# Altium PCB SnakeCard_Native.PcbDoc (part 1 of 2)
Units mm, origin at the board's own origin, x right, y up, seen from the top; angles counter-clockwise.
Board outline 85.6 x 54 mm, 2 copper layers (F.Cu, B.Cu), stack 0.8 mm thick; 136 components, 39 nets, 370 pads, 189 vias.
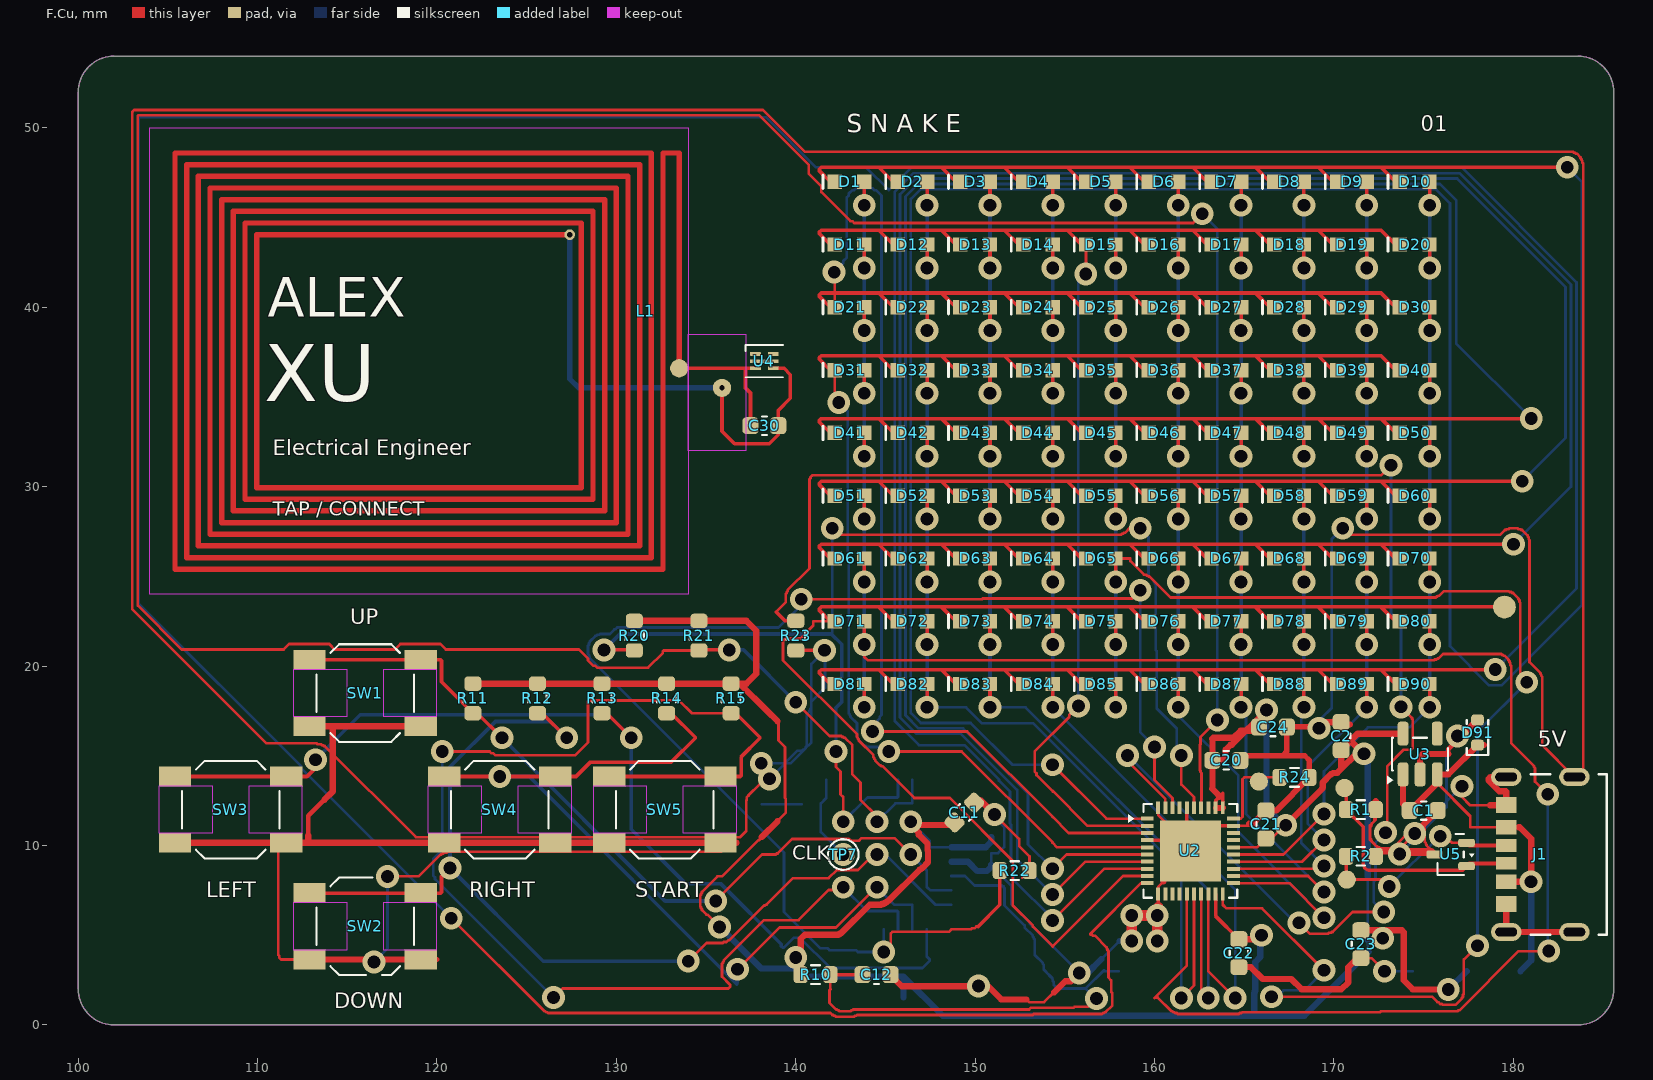
[diagram p0: F.Cu view]
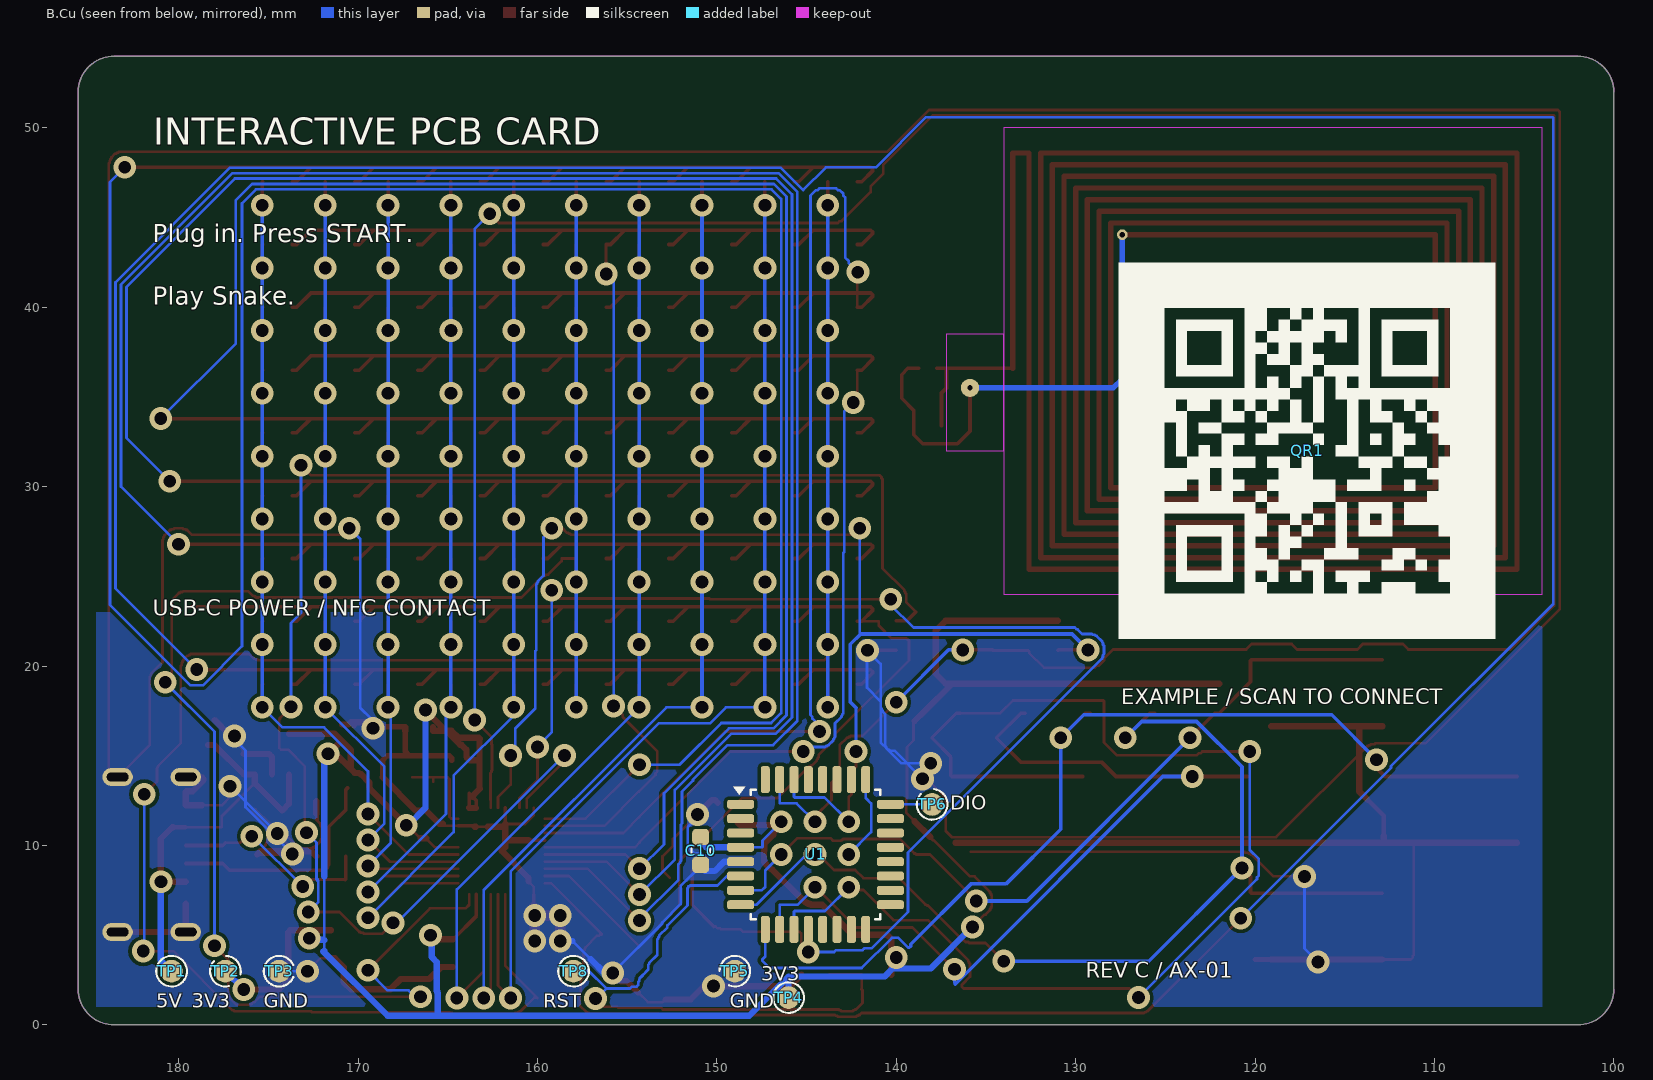
[diagram p1: B.Cu view, seen from below]

## Layer stack, top to bottom
F.Mask: solder mask 0.0102, Solder Resist, Dk 3.5
F.Cu: signal copper 0.0356
Dielectric 1: dielectric 0.7289, FR-4, Dk 4.8
B.Cu: signal copper 0.0356
B.Mask: solder mask 0.0102, Solder Resist, Dk 3.5

## Board outline
183.6,0 102,0 cw(c102,2) 100,2 100,52 cw(c102,52) 102,54 183.6,54 cw(c183.6,52) 185.6,52 185.6,2 cw(c183.6,2)

## Design rules (kind name [scope] priority, off if disabled: settings)
BoardOutlineClearance [All] p1: gap=0.3 ignorepadtopadclearanceinfootprint=FALSE
Clearance Native_SW5_OwnPad_Keepout_0 [IsFill And IsKeepOut And InComponent('SW5') vs IsPad And InComponent('SW5')] p1: gap=0 ignorepadtopadclearanceinfootprint=FALSE // Own SW pad only; source tangent boundary; 5.08nm fill inset; foreign clearance retained; UI priority and DRC pending.
Clearance Native_SW4_OwnPad_Keepout_0 [IsFill And IsKeepOut And InComponent('SW4') vs IsPad And InComponent('SW4')] p2: gap=0 ignorepadtopadclearanceinfootprint=FALSE // Own SW pad only; source tangent boundary; 5.08nm fill inset; foreign clearance retained; UI priority and DRC pending.
Clearance Native_SW3_OwnPad_Keepout_0 [IsFill And IsKeepOut And InComponent('SW3') vs IsPad And InComponent('SW3')] p3: gap=0 ignorepadtopadclearanceinfootprint=FALSE // Own SW pad only; source tangent boundary; 5.08nm fill inset; foreign clearance retained; UI priority and DRC pending.
Clearance Native_SW2_OwnPad_Keepout_0 [IsFill And IsKeepOut And InComponent('SW2') vs IsPad And InComponent('SW2')] p4: gap=0 ignorepadtopadclearanceinfootprint=FALSE // Own SW pad only; source tangent boundary; 5.08nm fill inset; foreign clearance retained; UI priority and DRC pending.
Clearance Native_SW1_OwnPad_Keepout_0 [IsFill And IsKeepOut And InComponent('SW1') vs IsPad And InComponent('SW1')] p5: gap=0 ignorepadtopadclearanceinfootprint=FALSE // Own SW pad only; source tangent boundary; 5.08nm fill inset; foreign clearance retained; UI priority and DRC pending.
Clearance "Clearence 0.2_Polygon" [InNamedPolygon('B.Cu-GND')] p6: gap=0.2 ignorepadtopadclearanceinfootprint=FALSE
Clearance Native_Global_Clearance_0p15mm [All] p7: gap=0.15 ignorepadtopadclearanceinfootprint=FALSE // Source global copper clearance 0.15mm; enable only below polygon 0.2mm priority.
HoleSize [All] p1: absolutevalues=TRUE maxlimit=2.54 minlimit=0.3 maxpercent=80.000 minpercent=20.000
MinimumAnnularRing Native_AnnularRing_0p10mm [All] p1: minimumring=0.1
MinimumSolderMaskSliver [All] p1: minsoldermaskwidth=0.13
PolygonConnect Polygon_B.Cu-GND_ConnectDirect [IsNamedPolygon('B.Cu-GND')] p1: connectstyle=Direct reliefconductorwidth=0.254 reliefentries=4 polygonreliefangle="90 Angle" airgapwidth=0.254
RoutingVias [All] p1: holewidth=0.711 width=1.27 viastyle="Through Hole" minholewidth=0.711 minwidth=1.27 maxholewidth=0.711 maxwidth=1.27
SilkToSilkClearance [All] p1: silktosilkclearance=0
SilkToSolderMaskClearance [All] p1: minsilkscreentomaskgap=0.15 clearancetoexposedcopper=FALSE
SolderMaskExpansion [All] p1: expansion=0 istentingtop=FALSE
Width [All] p1: maxlimit=10 minlimit=0.15 preferedwidth=0.2 minimp=50.000000 maximp=50.000000 favimp=50.000000
26 further rules are at their usual default settings.

## Components (designator, comment, footprint, x,y, rotation, side; value= is the part's Value field where it differs from the comment)
C1 "1uF 25V X7R" C_0603_1608Metric 175,11.95 r0 top
C2 "1uF 25V X7R" C_0603_1608Metric 170.4,16.1 r90 top
C10 "100nF 50V X7R" C_0603_1608Metric 150.9,9.7 r270 bottom
C11 "4.7uF 16V" C_0603_1608Metric 149.398,11.841 r45 top
C12 "100nF 50V X7R" C_0603_1608Metric 144.5,2.8 r0 top
C20 "100nF 50V X7R" C_0603_1608Metric 164,14.75 r0 top
C21 "100nF 50V X7R" C_0603_1608Metric 166.2,11.175 r90 top
C22 "100nF 50V X7R" C_0603_1608Metric 164.7,4 r270 top
C23 "1uF 25V X7R" C_0603_1608Metric 171.5,4.5 r270 top
C24 "1uF 25V X7R" C_0603_1608Metric 166.6,16.6 r0 top
C30 "DNP / C0G TUNE" C_0603_1608Metric__DNP_NOPASTE 138.25,33.4 r0 top
D1 "KT-0603R" Kingbright_APT1608SURCK 143,47 r0 top
D2 "KT-0603R" Kingbright_APT1608SURCK 146.5,47 r0 top
D3 "KT-0603R" Kingbright_APT1608SURCK 150,47 r0 top
D4 "KT-0603R" Kingbright_APT1608SURCK 153.5,47 r0 top
D5 "KT-0603R" Kingbright_APT1608SURCK 157,47 r0 top
D6 "KT-0603R" Kingbright_APT1608SURCK 160.5,47 r0 top
D7 "KT-0603R" Kingbright_APT1608SURCK 164,47 r0 top
D8 "KT-0603R" Kingbright_APT1608SURCK 167.5,47 r0 top
D9 "KT-0603R" Kingbright_APT1608SURCK 171,47 r0 top
D10 "KT-0603R" Kingbright_APT1608SURCK 174.5,47 r0 top
D11 "KT-0603R" Kingbright_APT1608SURCK 143,43.5 r0 top
D12 "KT-0603R" Kingbright_APT1608SURCK 146.5,43.5 r0 top
D13 "KT-0603R" Kingbright_APT1608SURCK 150,43.5 r0 top
D14 "KT-0603R" Kingbright_APT1608SURCK 153.5,43.5 r0 top
D15 "KT-0603R" Kingbright_APT1608SURCK 157,43.5 r0 top
D16 "KT-0603R" Kingbright_APT1608SURCK 160.5,43.5 r0 top
D17 "KT-0603R" Kingbright_APT1608SURCK 164,43.5 r0 top
D18 "KT-0603R" Kingbright_APT1608SURCK 167.5,43.5 r0 top
D19 "KT-0603R" Kingbright_APT1608SURCK 171,43.5 r0 top
D20 "KT-0603R" Kingbright_APT1608SURCK 174.5,43.5 r0 top
D21 "KT-0603R" Kingbright_APT1608SURCK 143,40 r0 top
D22 "KT-0603R" Kingbright_APT1608SURCK 146.5,40 r0 top
D23 "KT-0603R" Kingbright_APT1608SURCK 150,40 r0 top
D24 "KT-0603R" Kingbright_APT1608SURCK 153.5,40 r0 top
D25 "KT-0603R" Kingbright_APT1608SURCK 157,40 r0 top
D26 "KT-0603R" Kingbright_APT1608SURCK 160.5,40 r0 top
D27 "KT-0603R" Kingbright_APT1608SURCK 164,40 r0 top
D28 "KT-0603R" Kingbright_APT1608SURCK 167.5,40 r0 top
D29 "KT-0603R" Kingbright_APT1608SURCK 171,40 r0 top
D30 "KT-0603R" Kingbright_APT1608SURCK 174.5,40 r0 top
D31 "KT-0603R" Kingbright_APT1608SURCK 143,36.5 r0 top
D32 "KT-0603R" Kingbright_APT1608SURCK 146.5,36.5 r0 top
D33 "KT-0603R" Kingbright_APT1608SURCK 150,36.5 r0 top
D34 "KT-0603R" Kingbright_APT1608SURCK 153.5,36.5 r0 top
D35 "KT-0603R" Kingbright_APT1608SURCK 157,36.5 r0 top
D36 "KT-0603R" Kingbright_APT1608SURCK 160.5,36.5 r0 top
D37 "KT-0603R" Kingbright_APT1608SURCK 164,36.5 r0 top
D38 "KT-0603R" Kingbright_APT1608SURCK 167.5,36.5 r0 top
D39 "KT-0603R" Kingbright_APT1608SURCK 171,36.5 r0 top
D40 "KT-0603R" Kingbright_APT1608SURCK 174.5,36.5 r0 top
D41 "KT-0603R" Kingbright_APT1608SURCK 143,33 r0 top
D42 "KT-0603R" Kingbright_APT1608SURCK 146.5,33 r0 top
D43 "KT-0603R" Kingbright_APT1608SURCK 150,33 r0 top
D44 "KT-0603R" Kingbright_APT1608SURCK 153.5,33 r0 top
D45 "KT-0603R" Kingbright_APT1608SURCK 157,33 r0 top
D46 "KT-0603R" Kingbright_APT1608SURCK 160.5,33 r0 top
D47 "KT-0603R" Kingbright_APT1608SURCK 164,33 r0 top
D48 "KT-0603R" Kingbright_APT1608SURCK 167.5,33 r0 top
D49 "KT-0603R" Kingbright_APT1608SURCK 171,33 r0 top
D50 "KT-0603R" Kingbright_APT1608SURCK 174.5,33 r0 top
D51 "KT-0603R" Kingbright_APT1608SURCK 143,29.5 r0 top
D52 "KT-0603R" Kingbright_APT1608SURCK 146.5,29.5 r0 top
D53 "KT-0603R" Kingbright_APT1608SURCK 150,29.5 r0 top
D54 "KT-0603R" Kingbright_APT1608SURCK 153.5,29.5 r0 top
D55 "KT-0603R" Kingbright_APT1608SURCK 157,29.5 r0 top
D56 "KT-0603R" Kingbright_APT1608SURCK 160.5,29.5 r0 top
D57 "KT-0603R" Kingbright_APT1608SURCK 164,29.5 r0 top
D58 "KT-0603R" Kingbright_APT1608SURCK 167.5,29.5 r0 top
D59 "KT-0603R" Kingbright_APT1608SURCK 171,29.5 r0 top
D60 "KT-0603R" Kingbright_APT1608SURCK 174.5,29.5 r0 top
D61 "KT-0603R" Kingbright_APT1608SURCK 143,26 r0 top
D62 "KT-0603R" Kingbright_APT1608SURCK 146.5,26 r0 top
D63 "KT-0603R" Kingbright_APT1608SURCK 150,26 r0 top
D64 "KT-0603R" Kingbright_APT1608SURCK 153.5,26 r0 top
D65 "KT-0603R" Kingbright_APT1608SURCK 157,26 r0 top
D66 "KT-0603R" Kingbright_APT1608SURCK 160.5,26 r0 top
D67 "KT-0603R" Kingbright_APT1608SURCK 164,26 r0 top
D68 "KT-0603R" Kingbright_APT1608SURCK 167.5,26 r0 top
D69 "KT-0603R" Kingbright_APT1608SURCK 171,26 r0 top
D70 "KT-0603R" Kingbright_APT1608SURCK 174.5,26 r0 top
D71 "KT-0603R" Kingbright_APT1608SURCK 143,22.5 r0 top
D72 "KT-0603R" Kingbright_APT1608SURCK 146.5,22.5 r0 top
D73 "KT-0603R" Kingbright_APT1608SURCK 150,22.5 r0 top
D74 "KT-0603R" Kingbright_APT1608SURCK 153.5,22.5 r0 top
D75 "KT-0603R" Kingbright_APT1608SURCK 157,22.5 r0 top
D76 "KT-0603R" Kingbright_APT1608SURCK 160.5,22.5 r0 top
D77 "KT-0603R" Kingbright_APT1608SURCK 164,22.5 r0 top
D78 "KT-0603R" Kingbright_APT1608SURCK 167.5,22.5 r0 top
D79 "KT-0603R" Kingbright_APT1608SURCK 171,22.5 r0 top
D80 "KT-0603R" Kingbright_APT1608SURCK 174.5,22.5 r0 top
D81 "KT-0603R" Kingbright_APT1608SURCK 143,19 r0 top
D82 "KT-0603R" Kingbright_APT1608SURCK 146.5,19 r0 top
D83 "KT-0603R" Kingbright_APT1608SURCK 150,19 r0 top
D84 "KT-0603R" Kingbright_APT1608SURCK 153.5,19 r0 top
D85 "KT-0603R" Kingbright_APT1608SURCK 157,19 r0 top
D86 "KT-0603R" Kingbright_APT1608SURCK 160.5,19 r0 top
D87 "KT-0603R" Kingbright_APT1608SURCK 164,19 r0 top
D88 "KT-0603R" Kingbright_APT1608SURCK 167.5,19 r0 top
D89 "KT-0603R" Kingbright_APT1608SURCK 171,19 r0 top
D90 "KT-0603R" Kingbright_APT1608SURCK 174.5,19 r0 top
D91 "PESD5Z6.0,115" D_SOD-523 178,16.3 r90 top
J1 "UJC-HP-3-SMT-TR" CUI_UJC-HP-3-SMT-TR 179.6,9.5 r90 top
L1 "PCB LOOP / TUNE" NFC_PRINTED_COIL_8T_UNTUNED 100,54 r0 top locked net-tie
QR1 "Example QR / https://example.com/" Example_QR_21mm_BSilk 117.1,32 r180 bottom
R1 "5.1k 1%" R_0603_1608Metric 171.5,12 r0 top
R2 "5.1k 1%" R_0603_1608Metric 171.5,9.4 r0 top
R10 "10k 1%" R_0603_1608Metric 141.1,2.8 r0 top
R11 "10k 1%" R_0603_1608Metric 122,18.2 r270 top
R12 "10k 1%" R_0603_1608Metric 125.6,18.2 r270 top
R13 "10k 1%" R_0603_1608Metric 129.2,18.2 r270 top
R14 "10k 1%" R_0603_1608Metric 132.8,18.2 r270 top
R15 "10k 1%" R_0603_1608Metric 136.4,18.2 r270 top
R20 "2.2k 1%" R_0603_1608Metric 131,21.7 r270 top
R21 "2.2k 1%" R_0603_1608Metric 134.6,21.7 r270 top
R22 "100k 1%" R_0603_1608Metric 152.2,8.6 r0 top
R23 "10k 1%" R_0603_1608Metric 140,21.7 r270 top
R24 "20k 1%" R_0603_1608Metric 167.8,13.8 r0 top
SW1 "UP" SW_SPST_SKQG_WithStem__HAND_SOLDER_NOPASTE 116,18.5 r0 top
SW2 "DOWN" SW_SPST_SKQG_WithStem__HAND_SOLDER_NOPASTE 116,5.5 r0 top
SW3 "LEFT" SW_SPST_SKQG_WithStem__HAND_SOLDER_NOPASTE 108.5,12 r0 top
SW4 "RIGHT" SW_SPST_SKQG_WithStem__HAND_SOLDER_NOPASTE 123.5,12 r0 top
SW5 "START" SW_SPST_SKQG_WithStem__HAND_SOLDER_NOPASTE 132.7,12 r0 top
TP1 "VBUS_5V" TestPoint_Pad_D1.0mm 180.391,2.997 r0 bottom locked
TP2 "+3V3" TestPoint_Pad_D1.0mm 177.394,2.997 r0 bottom
TP3 "GND" TestPoint_Pad_D1.0mm 174.396,2.997 r0 bottom
TP4 "+3V3" TestPoint_Pad_D1.0mm 145.999,1.524 r0 bottom locked
TP5 "GND" TestPoint_Pad_D1.0mm 148.996,2.997 r0 bottom locked
TP6 "SWDIO" TestPoint_Pad_D1.0mm 137.998,12.294 r0 bottom locked
TP7 "SWCLK" TestPoint_Pad_D1.0mm 142.646,9.5 r0 top locked
TP8 "NRST" TestPoint_Pad_D1.0mm 157.988,2.997 r0 bottom locked
U1 "STM32G030K8T6" LQFP-32_7x7mm_P0.8mm 144.5,9.5 r180 bottom
U2 "IS31FL3737B-QFLS4-TR" IS31FL3737_QFN40_5x5mm_P0.4mm_EP3.4mm 162,9.7 r0 top
U3 "TPS7A2433DBVR" SOT-23-5 174.8,15.1 r90 top
U4 "ST25TN01K-AFH5" ST25TN01K_UFDFPN5_1.7x1.4mm 138.25,37 r0 top
U5 "TPD2E2U06QDCKRQ1" SOT-323_SC-70 176.5,9.5 r180 top

## Footprints (in the part's own frame and the unit in brackets; to place one, negate y for a bottom-side part, rotate by r counter-clockwise, add the part's x,y. Pads: shape width x height; smd on the part's side, far side on the other; paste and mask are expansions set on the pad)
C_0603_1608Metric [mm]
  rrect50% 0.9x0.95 smd mask+0: 1(-0.775,0) 2(0.775,0)
  silkscreen extent -0.14,-0.51 0.14,0.51
C_0603_1608Metric__DNP_NOPASTE [mm]
  rrect50% 0.9x0.95 smd paste-0.485 mask+0: 1(-0.775,0) 2(0.775,0)
  silkscreen extent -0.14,-0.51 0.14,0.51
CUI_UJC-HP-3-SMT-TR [mm]
  rect 0.7x1.15 smd mask+0.05: A5(-0.5,0.005) B5(0.5,0.005)
  rect 0.8x1.15 smd mask+0.05: A9(1.52,0.005) B9(-1.52,0.005)
  rect 0.9x1.15 smd mask+0.05: A12(2.75,0.005) B12(-2.75,0.005)
  rrect100% 1x1.7 hole 1.2 slot 0.5 at 0 deg paste-2539.97 mask+0.05: S1(-4.32,0) S2(4.32,0) S3(-4.32,-3.8) S4(4.32,-3.8)
  silkscreen extent -4.47,-5.6 4.47,-1.35
D_SOD-523 [mm]
  rrect50% 0.6x0.7 smd mask+0: 1(-0.7,0) 2(0.7,0)
  silkscreen extent -1.26,-0.6 0.7,0.6
Example_QR_21mm_BSilk [mm]
  silkscreen extent -10.5,-10.5 10.5,10.5
IS31FL3737_QFN40_5x5mm_P0.4mm_EP3.4mm [mm]
  rect 0.715x0.22 smd mask+0: 1(-2.408,1.8) 2(-2.408,1.4) 3(-2.408,1) 4(-2.408,0.6) 5(-2.408,0.2) 6(-2.408,-0.2) 7(-2.408,-0.6) 8(-2.408,-1) 9(-2.408,-1.4) 10(-2.408,-1.8) 21(2.408,-1.8) 22(2.408,-1.4) 23(2.408,-1) 24(2.408,-0.6) 25(2.408,-0.2) 26(2.408,0.2) 27(2.408,0.6) 28(2.408,1) 29(2.408,1.4) 30(2.408,1.8)
  rect 0.22x0.715 smd mask+0: 11(-1.8,-2.408) 12(-1.4,-2.408) 13(-1,-2.408) 14(-0.6,-2.408) 15(-0.2,-2.408) 16(0.2,-2.408) 17(0.6,-2.408) 18(1,-2.408) 19(1.4,-2.408) 20(1.8,-2.408) 31(1.8,2.408) 32(1.4,2.408) 33(1,2.408) 34(0.6,2.408) 35(0.2,2.408) 36(-0.2,2.408) 37(-0.6,2.408) 38(-1,2.408) 39(-1.4,2.408) 40(-1.8,2.408)
  rect 3.4x3.4 smd paste-1.71 mask+0: 41(0,0)
  rrect25% 0.9x0.9 on Top Paste mask-0.9: ""(-1.1,-1.1) ""(-1.1,0) ""(-1.1,1.1) ""(0,-1.1) ""(0,0) ""(0,1.1) ""(1.1,-1.1) ""(1.1,0) ""(1.1,1.1)
  silkscreen extent -3.47,-2.61 2.61,2.61
Kingbright_APT1608SURCK [mm]
  rect 0.8x0.8 smd mask+0: 1(-0.825,0) 2(0.825,0)
  silkscreen extent -1.49,-0.38 -1.49,0.38
LQFP-32_7x7mm_P0.8mm [mm]
  rrect50% 1.5x0.5 smd mask+0: 1(-4.175,2.8) 2(-4.175,2) 3(-4.175,1.2) 4(-4.175,0.4) 5(-4.175,-0.4) 6(-4.175,-1.2) 7(-4.175,-2) 8(-4.175,-2.8) 17(4.175,-2.8) 18(4.175,-2) 19(4.175,-1.2) 20(4.175,-0.4) 21(4.175,0.4) 22(4.175,1.2) 23(4.175,2) 24(4.175,2.8)
  rrect50% 0.5x1.5 smd mask+0: 9(-2.8,-4.175) 10(-2,-4.175) 11(-1.2,-4.175) 12(-0.4,-4.175) 13(0.4,-4.175) 14(1.2,-4.175) 15(2,-4.175) 16(2.8,-4.175) 25(2.8,4.175) 26(2,4.175) 27(1.2,4.175) 28(0.4,4.175) 29(-0.4,4.175) 30(-1.2,4.175) 31(-2,4.175) 32(-2.8,4.175)
  silkscreen extent -4.59,-3.61 3.61,3.79
NFC_PRINTED_COIL_8T_UNTUNED [mm]
  round 0.6 hole 0.3 paste-2539.97 mask-0.31: 1(27.4,-9.95)
  round 1.016 smd paste-1.016 mask+0: 1(33.502,-17.399)
  round 1.016 hole 0.3 paste-2539.97 mask+0: 2(35.89,-18.491)
  F.Cu lines w0.3: 27.4,-9.95 9.95,-9.95 9.95,-24.05 28.05,-24.05 28.05,-9.3 9.3,-9.3 9.3,-24.7 28.7,-24.7 28.7,-8.65 8.65,-8.65 8.65,-25.35 29.35,-25.35 29.35,-8 8,-8 8,-26 30,-26 30,-7.35 7.35,-7.35 7.35,-26.65 30.65,-26.65 30.65,-6.7 6.7,-6.7 6.7,-27.3 31.3,-27.3 31.3,-6.05 6.05,-6.05 6.05,-27.95 31.95,-27.95 31.95,-5.4 5.4,-5.4 5.4,-28.6 32.6,-28.6 32.6,-5.4 33.5,-5.4 33.5,-17.4
  B.Cu lines w0.3: 27.4,-9.95 27.4,-17.983 27.908,-18.491 35.89,-18.491
R_0603_1608Metric [mm]
  rrect50% 0.8x0.95 smd mask+0: 1(-0.825,0) 2(0.825,0)
  silkscreen extent -0.24,-0.52 0.24,0.52
SOT-23-5 [mm]
  rrect50% 1.325x0.6 smd mask+0: 1(-1.138,0.95) 2(-1.138,0) 3(-1.138,-0.95) 4(1.138,-0.95) 5(1.138,0.95)
  silkscreen extent -1.69,-1.56 0.91,1.84
SOT-323_SC-70 [mm]
  rrect50% 0.925x0.45 smd mask+0: 1(-0.887,0.65) 2(-0.887,-0.65) 3(0.887,0)
  silkscreen extent -1.32,-1.13 0.73,1.13
ST25TN01K_UFDFPN5_1.7x1.4mm [mm]
  rrect20% 0.6x0.2 smd mask+0.03: 1(-0.5,0.4) 2(0.5,0.4) 3(-0.5,-0.4) 4(0.5,-0.4)
  rrect20% 1.6x0.2 smd mask+0.03: 5(0,0)
  silkscreen extent -1.05,-0.9 1.05,0.9
SW_SPST_SKQG_WithStem__HAND_SOLDER_NOPASTE [mm]
  rect 1.8x1.1 smd paste-0.91 mask+0: 1(-3.1,1.85) 1(3.1,1.85) 2(-3.1,-1.85) 2(3.1,-1.85)
  F.Cu keep-out region: 1,-1.3 4,-1.3 4,1.3 1,1.3
  F.Cu keep-out region: -4,-1.3 -1,-1.3 -1,1.3 -4,1.3
  silkscreen extent -2.72,-2.72 2.72,2.72
TestPoint_Pad_D1.0mm [mm]
  round 1.27 smd paste-1.27 mask+0: 1(0,0)
  silkscreen extent -0.85,-0.85 0.86,0.85

## Part data
C1 C2 C23 C24: library part CAP_1uF_35V_X7R_0603, "1 uF; 25 V; X7R; 0603", MPN=C1608X7R1V105K080AC, Manufacturer=TDK, Datasheet=https://product.tdk.com/system/files/dam/doc/product/capacitor/ceramic/mlcc/charasheet/c1608x7r1v105k080ac.pdf, KiLib_Generator=SMD_2terminal_chip_molded
C10 C12 C20 C21 C22: library part CAP_100nF_50V_X7R_0603, "100 nF; 50 V; X7R; 0603", MPN=C1608X7R1H104K080AA, Manufacturer=TDK, Datasheet=https://product.tdk.com/info/en/documents/chara_sheet/C1608X7R1H104K080AA.pdf, KiLib_Generator=SMD_2terminal_chip_molded
C11: library part CAP_4p7uF_16V_0603, "4.7 uF; 16 V; 0603; ceramic", MPN=GRM188Z71C475KE21D, Manufacturer="Murata Manufacturing", Datasheet=https://search.murata.co.jp/Ceramy/image/img/A01X/G101/ENG/GRM188Z71C475KE21-01A.pdf, KiLib_Generator=SMD_2terminal_chip_molded
C30: library part CAP_TUNE_C0G_DNP_0603, "Capacitor SMD 0603 (1608 Metric), square (rectangular) end terminal, IPC-7351 nominal, (Body size source: IPC-SM-782 page 76, https://www.pcb-3d.com/wordpress/wp-content/uploads/ipc-sm-782a_amendment_1_and_2.pdf)", KiLib_Generator=SMD_2terminal_chip_molded
D1 D2 D3 D4 D5 D6 D7 D8 D9 D10 D11 D12 D13 D14 D15 D16 D17 D18 D19 D20 D21 D22 D23 D24 D25 D26 D27 D28 D29 D30 D31 D32 D33 D34 D35 D36 D37 D38 D39 D40 D41 D42 D43 D44 D45 D46 D47 D48 D49 D50 D51 D52 D53 D54 D55 D56 D57 D58 D59 D60 D61 D62 D63 D64 D65 D66 D67 D68 D69 D70 D71 D72 D73 D74 D75 D76 D77 D78 D79 D80 D81 D82 D83 D84 D85 D86 D87 D88 D89 D90: library part LED_RED_APT1608SURCK, "Red 1608 LED", MPN=APT1608SURCK, Manufacturer=Kingbright, Datasheet=https://www.kingbrightusa.com/images/catalog/SPEC/APT1608SURCK.pdf, KiLib_Generator="Project footprint derived from Kingbright APT1608SURCK V22A p1"
D91: library part ESD_PESD5Z6_0_UNIDIR_SOD523, "6 V unidirectional TVS; SOD523", MPN=TPD1E10B06DYAR, Manufacturer="Texas Instruments", Datasheet=https://www.ti.com/lit/ds/symlink/tpd1e10b06.pdf
J1: library part CONN_USB_C_UJC_HP_3, "USB-C power-only receptacle; 0.8 mm PCB", Manufacturer="Same Sky", Datasheet=https://www.sameskydevices.com/product/resource/ujc-hp-3-smt-tr.pdf, MPN=UJC-HP-3-SMT-TR
L1: library part NFC_PRINTED_COIL_8T_UNTUNED
QR1: library part Example_QR_21mm_BSilk
R1 R2: library part RES_5p1k_1PCT_0603, "5.1 kohm; 1%; 0603", MPN=ERJ3EKF5101V, Manufacturer="Panasonic Industry", Datasheet=https://industrial.panasonic.com/cdbs/www-data/pdf/RDA0000/AOA0000C304.pdf, KiLib_Generator=SMD_2terminal_chip_molded
R10 R11 R12 R13 R14 R15 R23: library part RES_10k_1PCT_0603, "10 kohm; 1%; 0603", MPN=ERJ3EKF1002V, Manufacturer="Panasonic Industry", Datasheet=https://industrial.panasonic.com/cdbs/www-data/pdf/RDA0000/AOA0000C304.pdf, KiLib_Generator=SMD_2terminal_chip_molded
R20 R21: library part RES_2p2k_1PCT_0603, "2.2 kohm; 1%; 0603", MPN=ERJ3EKF2201V, Manufacturer="Panasonic Industry", Datasheet=https://industrial.panasonic.com/cdbs/www-data/pdf/RDA0000/AOA0000C304.pdf, KiLib_Generator=SMD_2terminal_chip_molded
R22: library part RES_100k_1PCT_0603, "100 kohm; 1%; 0603", MPN=ERJ3EKF1003V, Manufacturer="Panasonic Industry", Datasheet=https://industrial.panasonic.com/cdbs/www-data/pdf/RDA0000/AOA0000C304.pdf, KiLib_Generator=SMD_2terminal_chip_molded
R24: library part RES_20k_1PCT_0603, "20 kohm; 1%; 0603; driver REXT", MPN=ERJ3EKF2002V, Manufacturer="Panasonic Industry", Datasheet=https://industrial.panasonic.com/cdbs/www-data/pdf/RDA0000/AOA0000C304.pdf, KiLib_Generator=SMD_2terminal_chip_molded
SW1: library part SW_UP_SKQG, "Tactile switch; manual solder after reflow", MPN=SKQGABE010, Manufacturer="Alps Alpine", Datasheet=https://tech.alpsalpine.com/cms.media/SKQGAB_KQG_719_EN_cc4e10226e.pdf
SW2: library part SW_DOWN_SKQG, "Tactile switch; manual solder after reflow", MPN=SKQGABE010, Manufacturer="Alps Alpine", Datasheet=https://tech.alpsalpine.com/cms.media/SKQGAB_KQG_719_EN_cc4e10226e.pdf
SW3: library part SW_LEFT_SKQG, "Tactile switch; manual solder after reflow", MPN=SKQGABE010, Manufacturer="Alps Alpine", Datasheet=https://tech.alpsalpine.com/cms.media/SKQGAB_KQG_719_EN_cc4e10226e.pdf
SW4: library part SW_RIGHT_SKQG, "Tactile switch; manual solder after reflow", MPN=SKQGABE010, Manufacturer="Alps Alpine", Datasheet=https://tech.alpsalpine.com/cms.media/SKQGAB_KQG_719_EN_cc4e10226e.pdf
SW5: library part SW_START_SKQG, "Tactile switch; manual solder after reflow", MPN=SKQGABE010, Manufacturer="Alps Alpine", Datasheet=https://tech.alpsalpine.com/cms.media/SKQGAB_KQG_719_EN_cc4e10226e.pdf
TP1: library part TP_VBUS_5V, "SMD pad as test Point, diameter 1.0mm"
TP2 TP4: library part TP_3V3, "SMD pad as test Point, diameter 1.0mm"
TP3 TP5: library part TP_GND, "SMD pad as test Point, diameter 1.0mm"
TP6: library part TP_SWDIO, "SMD pad as test Point, diameter 1.0mm"
TP7: library part TP_SWCLK, "SMD pad as test Point, diameter 1.0mm"
TP8: library part TP_NRST, "SMD pad as test Point, diameter 1.0mm"
U1: library part MCU_STM32G030K8T6, "STM32G0 MCU; LQFP-32", Manufacturer=STMicroelectronics, Datasheet=https://www.st.com/resource/en/datasheet/stm32g030k8.pdf, KiLib_Generator=package/gullwing, MPN=STM32G030K8T6
U2: library part LED_DRIVER_IS31FL3737_QFLS4, "LED matrix driver; QFN-40 with exposed GND pad", MPN=IS31FL3737-QFLS4-TR, Manufacturer="Lumissil Microsystems", Datasheet=https://www.lumissil.com/assets/pdf/core/IS31FL3737_DS.pdf, KiLib_Generator="Project footprint derived from Lumissil IS31FL3737 Rev G p28"
U3: library part LDO_TPS7A2433DBVR, "3.3 V LDO; DBV SOT-23-5; 18 V operating input", MPN=TLV75533PDBVR, Manufacturer="Texas Instruments", Datasheet=https://www.ti.com/lit/ds/symlink/tlv755p.pdf, KiLib_Generator=package/gullwing
U4: library part NFC_ST25TN01K_AFH5, "Passive NFC tag; UFDFPN5", Manufacturer=STMicroelectronics, Datasheet=https://www.st.com/resource/en/datasheet/st25tn01k.pdf, MPN=ST25TN01K-AFH5
U5: library part ESD_TPD2E2U06DCK, "Dual CC-line ESD protection; DCK SC70-3", MPN=TPD2E2U06DCKR, Manufacturer="Texas Instruments", Datasheet=https://www.ti.com/lit/ds/symlink/tpd2e2u06.pdf, KiLib_Generator=package/gullwing

## Free pads (board coordinates)
  round 1.016 smd paste-1.016 mask+0: RN01(165.811,13.564) RN02(170.586,13.208) RN03(170.713,8.103)
  round 1.27 smd paste-1.27 mask+0: RN04(179.502,23.292)

## Via types
v1: diameter 1.27, hole 0.711, F.Cu to B.Cu, 189 vias

## Nets (pads, with @x,y where several pads share a name; then routed paths per layer and width w, separated by ;. In a path a pad name is that pad's centre, name@x,y a point inside that pad or via, vN(x,y) a via of type N, cw(c..) or ccw(c..) an arc to the next point about the centre after c; other vN are vias at no path point)
+3V3: C2.1 C10.1 C11.1 C20.1 C21.1 C22.1 C23.1 C24.1 R10.1 R11.1 R12.1 R13.1 R14.1 R15.1 R20.1 R21.1 TP2.1 TP4.1 U1.4 U2.19 U2.26 U2.31 U2.32 U3.5 | length 179.3
  F.Cu w0.15: v1@135.761,5.463 135.077,6.147 135.026,6.147 134.772,6.401 134.772,6.452 134.722,6.502 134.722,6.553 134.671,6.604 134.671,7.214 134.722,7.264 134.722,7.315 134.772,7.366 134.772,7.417 135.636,8.28 135.89,8.28 137.922,10.312 137.973,10.312 138.125,10.465 138.115,10.475 138.1,10.475 ; 138.985,11.36 138.97,11.36 139.446,11.836 139.446,12.598 139.395,12.649 139.395,15.494 139.04,15.85 139.04,16.764 138.989,16.815 138.989,16.916 138.985,16.92 ; v1(140.005,3.759) 140.275,3.489 R10.1@140.275,2.8 ; U2.26@164.408,9.9 165.7,9.9 C21.1@166.2,10.4 ; C21.1@166.508,10.4 169.266,13.157 169.266,13.31 169.875,13.919 169.926,13.919 169.977,13.97 170.231,13.97 170.4,14.139 C2.1@170.4,15.325
  F.Cu w0.2: U2.19@163.4,7.293 163.4,6.075 C22.1@164.7,4.775 ; U2.32@163.4,12.108 163.4,12.5 163.8,12.9 163.8,12.7 U2.31@163.8,12.108
  F.Cu w0.22: U2.32@163.4,12.108 163.414,12.093 U2.32@163.437,12.093
  F.Cu w0.35: R11.1@122,19.025 137.25,19.025 137.8,19.575 137.8,21.975 137.25,22.525 R20.1@131,22.525 ; 136.88,19.025 138.405,17.501 138.985,16.92 ; 138.1,10.475 138.985,11.36 ; R10.1@140.275,2.8 140.275,4.791 140.284,4.801 140.513,5.029 142.367,5.029 142.392,5.055 142.443,5.055 142.494,5.105 142.519,5.105 144.12,6.706 144.729,6.706 144.755,6.731 144.831,6.731 144.856,6.756 144.907,6.756 144.932,6.782 144.958,6.782 144.983,6.807 145.009,6.807 145.034,6.833 145.059,6.833 145.136,6.909 145.161,6.909 146.914,8.661 146.939,8.661 147.015,8.738 147.041,8.738 147.371,9.068 147.371,9.703 147.345,9.728 147.345,10.109 146.863,10.592 146.863,10.719 146.406,11.176 v1(146.406,11.328) 146.591,11.143 148.7,11.143 C11.1@148.85,11.293 ; U2.32@163.437,12.093 163.786,12.093 U2.31@163.8,12.108 ; 163.6,12.7 163.601,12.7 163.601,12.751 163.576,12.776 163.576,12.802 163.22,13.157 163.225,13.162 C20.1@163.225,14.75 ; C22.1@164.7,4.775 165.659,4.775 165.887,5.004 v1(165.964,5.004) ; C24.1@165.825,16.6 165.825,16.4 165.032,16.4 165.024,16.408 164.795,16.408 164.389,16.002 163.271,16.002 163.22,15.951 163.225,15.947 C20.1@163.225,14.75 ; C21.1@166.2,10.4 C21.1@166.502,10.4 ; v1(166.243,17.551) 164.313,15.621 164.236,15.621 163.957,15.342 163.957,14.935 163.772,14.75 C20.1@163.225,14.75 ; v1(167.31,11.125) 169.342,13.157 169.342,13.208 169.367,13.233 169.367,13.513 169.824,13.97 169.85,13.97 169.901,14.021 169.926,14.021 169.951,14.046 170.18,14.046 v1@171.45,15.316 ; 170.4,14.298 C2.1@170.4,15.325 171.312,16.238 U3.5@173.85,16.238 ; 170.947,15.873 170.944,15.873 170.942,15.875 170.942,15.824 v1@171.45,15.316 ; C23.1@171.5,5.275 173.787,5.275 173.888,5.173 173.888,2.489 174.398,1.98 v1(176.365,1.98) ; v1(171.673,15.114) 171.462,15.325 171.459,15.325 v1@171.45,15.316 ; v1@172.396,5.275 172.398,5.275 172.39,5.283 172.441,5.232 172.441,5.08 172.695,4.826 v1(172.72,4.826)
  B.Cu w0.15: v1(140.005,3.759) 140.005,3.353 140.208,3.15 140.206,3.151 140.186,3.151 ; v1(146.406,11.328) 147.45,10.284 147.45,9.925 147.475,9.9 U1.4@148.675,9.9 ; 171.885,4.142 171.885,8.274
  B.Cu w0.35: v1(135.753,5.463) 138.064,3.151 140.186,3.151 140.637,2.7 145.999,2.7 ; TP4.1@145.999,1.524 145.999,2.7 ; U1.4@148.675,9.9 150.6,9.9 150.9,10.2 C10.1@150.9,10.475 ; 165.686,0.51 165.684,0.508 165.557,0.635 165.557,1.778 165.583,1.803 165.583,1.88 165.608,1.905 165.608,3.505 165.887,3.785 165.887,4.928 v1(165.964,5.004) ; v1(166.243,17.551) 166.243,12.09 167.208,11.125 v1(167.31,11.125) ; v1(171.673,15.114) 171.885,14.902 171.885,8.274 ; 171.885,4.142 171.935,4.091 168.354,0.51 148.487,0.51 148.19,0.51 145.999,2.7 ; 171.885,4.732 171.889,4.732 171.882,4.724 171.907,4.75 172.491,4.75 172.618,4.877 172.669,4.877 v1(172.72,4.826) ; v1@176.376,1.98 TP2.1@177.394,2.997
BTN_DOWN: R12.2 SW2.1 U1.8 | length 58.4
  F.Cu w0.15: v1(134.01,3.556) 135.026,4.572 135.941,4.572 135.992,4.623 136.144,4.623 136.246,4.724 136.296,4.724 138.227,6.655 138.278,6.655 138.328,6.706 138.379,6.706 139.852,8.179 141.834,8.179 142.291,8.636 143.459,8.636 144.221,9.398 144.323,9.398 144.424,9.5 v1(144.526,9.5)
  F.Cu w0.2: SW2.1@112.9,7.35 120.201,7.35 120.252,7.401 120.252,8.276 v1(120.726,8.75) ; R12.2@125.6,17.375 125.856,17.375 v1(127.229,16.002)
  B.Cu w0.15: v1(144.526,9.5) 145,9.5 147.8,6.7 U1.8@148.675,6.7
  B.Cu w0.2: v1(127.229,16.002) 126.315,16.916 123.259,16.916 120.726,14.382 v1(120.726,8.75) 125.92,3.556 v1(134.01,3.556)
BTN_LEFT: R13.2 SW3.1 U1.9 | length 57.3
  F.Cu w0.2: SW3.1@105.4,13.85 112.752,13.85 113.226,14.324 v1(113.226,14.787) ; R13.2@129.2,17.375 129.462,17.375 v1(130.835,16.002)
  B.Cu w0.15: 139.192,4.394 139.268,4.318 139.344,4.318 139.883,4.857 140.243,4.857 141.925,3.175 147.066,3.175 147.472,3.581 147.472,3.632 147.3,3.805 U1.9@147.3,5.325
  B.Cu w0.2: v1(113.226,14.787) 115.724,17.286 129.552,17.286 v1(130.835,16.002) 130.835,10.91 133.885,7.861 135.837,7.861 139.192,4.505 139.192,4.394
BTN_RIGHT: R14.2 SW4.1 U1.10 | length 49.3
  F.Cu w0.15: v1(136.754,3.099) 139.09,5.436 142.24,5.436 144.475,7.671 v1(144.526,7.671)
  F.Cu w0.2: SW4.1@120.4,13.85 127.752,13.85 128.553,14.652 133.067,14.652 134.391,15.977 134.391,16.027 133.044,17.375 R14.2@132.8,17.375
  B.Cu w0.15: 136.717,2.272 136.703,2.286 136.754,2.337 v1(136.754,3.099) ; v1(144.526,7.671) 145.5,6.697 146.475,6.697 146.5,6.671 U1.10@146.5,5.325
  B.Cu w0.2: v1(123.495,13.85) 125.139,13.85 136.717,2.272
BTN_START: R15.2 SW5.1 U1.11 | length 72.7
  F.Cu w0.15: v1(120.294,15.24) 122.936,15.24 123.038,15.138 123.139,15.138 123.241,15.037 127.711,15.037 128.422,15.748 128.422,18.059 128.448,18.085 133.502,18.085 134.214,17.374 134.417,17.374 134.418,17.375 R15.2@136.4,17.375 ; v1(126.492,1.524) 127,2.032 136.246,2.032 136.347,2.134 136.347,2.235 135.89,2.692 135.89,3.404 135.941,3.454 135.941,3.505 135.992,3.556 135.992,3.607 138.227,5.842 140.157,5.842 141.834,7.518 142.24,7.518 142.291,7.569 142.443,7.569 142.545,7.671 v1(142.646,7.671)
  F.Cu w0.2: SW5.1@129.6,13.85 136.901,13.85 136.952,13.901 136.952,14.93 137.998,15.977 137.998,16.027 136.651,17.375 R15.2@136.4,17.375
  B.Cu w0.15: v1(120.294,15.24) 120.294,9.754 119.786,9.246 119.786,8.331 119.888,8.23 119.888,8.128 v1(126.492,1.524) ; v1(142.646,7.671) 143.967,6.35 145.675,6.35 145.7,6.325 U1.11@145.7,5.325
BTN_UP: R11.2 SW1.1 U1.7 | length 45.3
  F.Cu w0.15: v1(135.534,6.909) 138.125,9.5 138.887,9.5 138.938,9.55 138.989,9.55 139.802,10.363 142.951,10.363 143.002,10.312 143.053,10.312 143.104,10.262 143.51,10.262 143.662,10.414 145.491,10.414 v1(146.406,9.5)
  F.Cu w0.2: SW1.1@112.9,20.35 120.201,20.35 120.252,20.299 120.252,19.123 R11.2@122,17.375 122.249,17.375 v1(123.622,16.002)
  B.Cu w0.15: v1(146.406,9.5) 147.3,8.605 147.3,7.7 147.5,7.5 U1.7@148.675,7.5
  B.Cu w0.2: v1(123.622,16.002) 132.715,6.909 v1(135.534,6.909)